# Altium PCB MainBoardPCB_4.PcbDoc (part 18 of 32)
Units mm, origin at the board's own origin, x right, y up, seen from the top; angles counter-clockwise.
Board outline 333.63 x 349.38 mm, 16 copper layers (L1, L2 (GND), L3 (Sign), L4 (GND), L5 (Sign), L6 (PWR/GND), L7(PWR/GND), L8 (Plane_GND), L9 (PWR/GND), L10 (PWR/GND), L11 (PWR/GND), L12 (Sign), L13 (GND), L14 (Sign), L15 (GND), L16), stack 2.502 mm thick; 2205 components, 1648 nets, 8314 pads, 3172 vias.
Unrouted connection lines stored in the file: 5141.
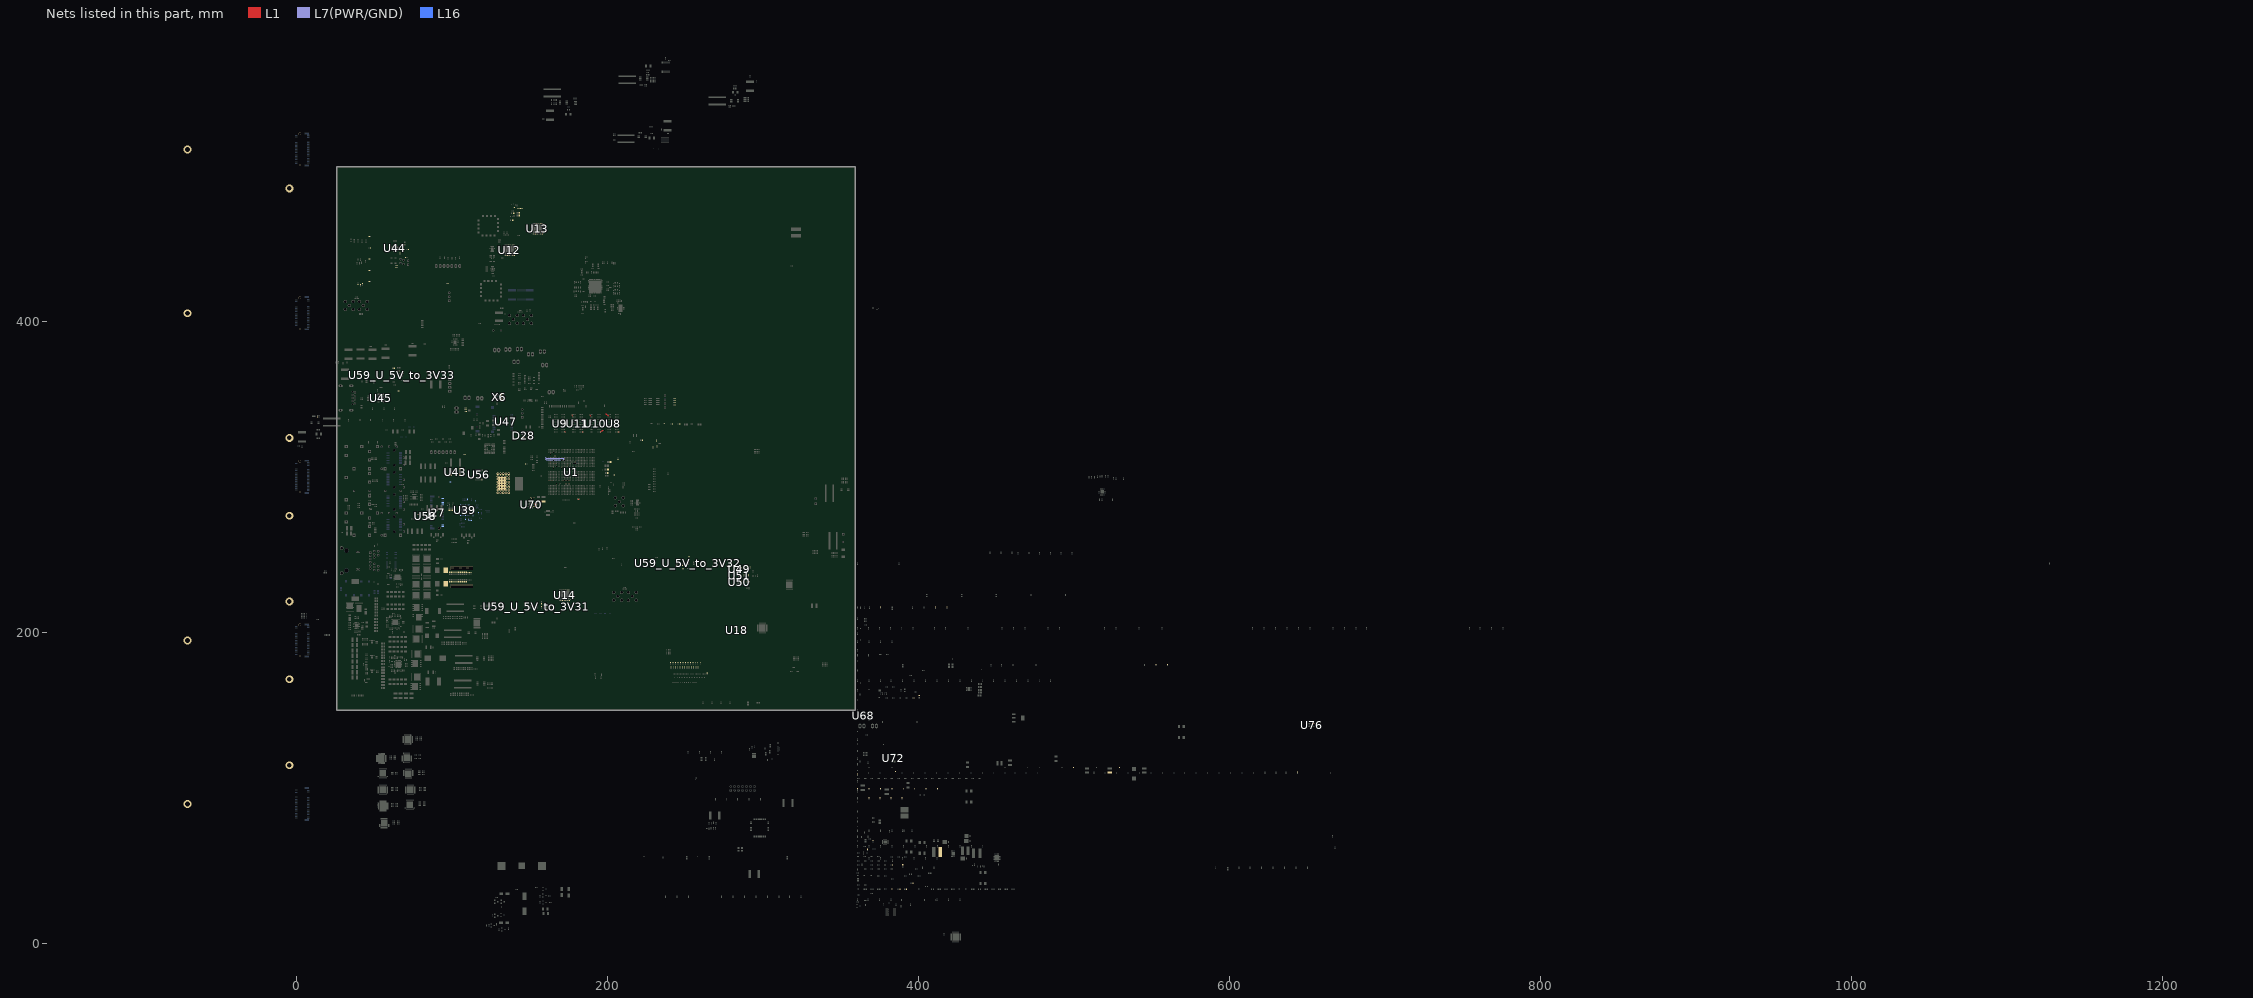
[diagram p21: the nets of this part, all layers, seen from the top]

## Part data (continued)
R532: library part Resistor, "Res Thick Film 0402 75 Ohm 1% 1/10W 100ppm/C Molded SMD SMD Punched Carrier T/R", Case Code (Imperial)=0402, Case Code (Metric)=1005, Manufacturer=Panasonic, Manufacturer Part Number=ERJ-2RKF75R0X, Max Operating Temperature=155°C, Max Power Dissipation=100mW, Min Operating Temperature=-55°C, Package Quantity=1, Supplier Part Number 1=P75.0LDKR-ND, Temperature Coefficient=100ppm/°C, Tolerance=1%, Voltage Rating=50V, Case/Package=0402, Category="Chip SMD Resistors", ComponentLink1Description=https://datasheet.ciiva.com/11821/0900766b80f80784-11821360.pdf?src-supplier=RSComponents, ComponentLink1URL=https://datasheet.ciiva.com/11821/0900766b80f80784-11821360.pdf?src-supplier=RSComponents, ComponentLink2Description=https://datasheet.ciiva.com/30254/aoa0000ce2-30254694.pdf?src-supplier=Onlinecomponents.com, ComponentLink2URL=https://datasheet.ciiva.com/30254/aoa0000ce2-30254694.pdf?src-supplier=Onlinecomponents.com, ComponentLink3Description=https://datasheet.ciiva.com/43460/426256-43460278.pdf?src-supplier=Farnell, ComponentLink3URL=https://datasheet.ciiva.com/43460/426256-43460278.pdf?src-supplier=Farnell, ComponentLink4Description=https://datasheet.ciiva.com/16777/70260748-16777802.pdf?src-supplier=Allied+Electronics, ComponentLink4URL=https://datasheet.ciiva.com/16777/70260748-16777802.pdf?src-supplier=Allied+Electronics, ComponentLink5Description=https://datasheet.ciiva.com/24071/aoa0000ce2-24071598.pdf?src-supplier=Mouser, ComponentLink5URL=https://datasheet.ciiva.com/24071/aoa0000ce2-24071598.pdf?src-supplier=Mouser, ComponentLink6Description=https://datasheet.ciiva.com/16772/70260748-16772175.pdf?src-supplier=Allied+Electronics, ComponentLink6URL=https://datasheet.ciiva.com/16772/70260748-16772175.pdf?src-supplier=Allied+Electronics, ComponentLink7Description=https://datasheet.ciiva.com/46377/426256-46377007.pdf?src-supplier=Element14, ComponentLink7URL=https://datasheet.ciiva.com/46377/426256-46377007.pdf?src-supplier=Element14, ComponentLink8Description=https://datasheet.ciiva.com/48531/aoa0000ce2-48531055.pdf?src-supplier=Avnet, ComponentLink8URL=https://datasheet.ciiva.com/48531/aoa0000ce2-48531055.pdf?src-supplier=Avnet, ComponentLink9Description=https://datasheet.ciiva.com/5917/426256-5917818.pdf?src-supplier=Farnell, ComponentLink9URL=https://datasheet.ciiva.com/5917/426256-5917818.pdf?src-supplier=Farnell, ComponentLink10Description=https://datasheet.ciiva.com/46388/426256-46388476.pdf?src-supplier=Element14, ComponentLink10URL=https://datasheet.ciiva.com/46388/426256-46388476.pdf?src-supplier=Element14, ComponentLink11Description=https://datasheet.ciiva.com/9187/aoa0000ce2-9187662.pdf?src-supplier=Avnet, ComponentLink11URL=https://datasheet.ciiva.com/9187/aoa0000ce2-9187662.pdf?src-supplier=Avnet, Composition="Thick Film", Contact Plating=Tin, Depth=0.5mm, Features="Automotive AEC-Q200", Height=0.35mm, Lead Free="Lead Free", Length=1mm, Military Standard=Not, Mount="Surface Mount", Number of Terminations=2, Packaging="Tape and Reel", Power Rating=100mW, Pricing 1="1=0,10000, 10=0,04000, 100=0,01620, 1000=0,00729, 2500=0,00632, 5000=0,00523 (USD)", Radiation Hardening=No, REACH SVHC="No SVHC", Resistance=75R, RoHS=Yes, Stock 1=1175660, Supplier 1=Digi-Key, Termination=SMD/SMT, Voltage Rating (DC)=50V, Width=0.02inch
R533: library part Resistor, "RES 30 OHM 1% 1/16W 0402", Case/Package=0402, Manufacturer="Stackpole Electronics", Manufacturer Part Number=RMCF0402FT30R0, Max Operating Temperature=155°C, Min Operating Temperature=-55°C, Supplier Part Number 1=RMCF0402FT30R0CT-ND, Temperature Coefficient=100ppm/°C, Tolerance=1%, Category="Chip SMD Resistors", ComponentLink1Description=https://www.seielect.com/catalog/SEI-Packaging.pdf?src-supplier=Digi-Key, ComponentLink1URL=https://www.seielect.com/catalog/SEI-Packaging.pdf?src-supplier=Digi-Key, ComponentLink2Description=https://www.seielect.com/catalog/SEI-RMCF_RMCP.pdf?src-supplier=Avnet, ComponentLink2URL=https://www.seielect.com/catalog/SEI-RMCF_RMCP.pdf?src-supplier=Avnet, Composition="Thick Film", Contact Plating=Tin,Matte, Mount="Surface Mount", Packaging="Tape and Reel", Pricing 1="1=0,10000, 10=0,01400, 100=0,00580, 1000=0,00262, 2500=0,00228, 5000=0,00188 (USD)", Radiation Hardening=No, Resistance=30R, RoHS=Yes, Stock 1=30664, Supplier 1=Digi-Key
R536 R537: library part Resistor, "RES SMD 150 OHM 1% 1/10W 0402", Case Code (Imperial)=0402, Case Code (Metric)=1005, Manufacturer=Panasonic, Manufacturer Part Number=ERJ-2RKF1500X, Max Operating Temperature=155°C, Max Power Dissipation=100mW, Min Operating Temperature=-55°C, Package Quantity=1, Supplier Part Number 1=P150LCT-ND, Temperature Coefficient=100ppm/°C, Tolerance=1%, Voltage Rating=50V, Case/Package=0402, Category="Chip SMD Resistors", ComponentLink1Description=https://datasheet.ciiva.com/34303/1987126-34303555.pdf?src-supplier=Jameco, ComponentLink1URL=https://datasheet.ciiva.com/34303/1987126-34303555.pdf?src-supplier=Jameco, ComponentLink2Description=https://datasheet.ciiva.com/11821/0900766b80f80784-11821183.pdf?src-supplier=RSComponents, ComponentLink2URL=https://datasheet.ciiva.com/11821/0900766b80f80784-11821183.pdf?src-supplier=RSComponents, ComponentLink3Description=https://datasheet.ciiva.com/16774/70260748-16774549.pdf?src-supplier=Allied+Electronics, ComponentLink3URL=https://datasheet.ciiva.com/16774/70260748-16774549.pdf?src-supplier=Allied+Electronics, ComponentLink4Description=https://datasheet.ciiva.com/43467/1678782-43467237.pdf?src-supplier=Farnell, ComponentLink4URL=https://datasheet.ciiva.com/43467/1678782-43467237.pdf?src-supplier=Farnell, ComponentLink5Description=https://datasheet.ciiva.com/7887/426256-7887016.pdf?src-supplier=Element14, ComponentLink5URL=https://datasheet.ciiva.com/7887/426256-7887016.pdf?src-supplier=Element14, ComponentLink6Description=https://datasheet.ciiva.com/16371/aoa0000ce2-16371497.pdf?src-supplier=Future+Electronics, ComponentLink6URL=https://datasheet.ciiva.com/16371/aoa0000ce2-16371497.pdf?src-supplier=Future+Electronics, ComponentLink7Description=https://datasheet.ciiva.com/7886/aoa0000ce2-7886714.pdf?src-supplier=Element14, ComponentLink7URL=https://datasheet.ciiva.com/7886/aoa0000ce2-7886714.pdf?src-supplier=Element14, ComponentLink8Description=https://datasheet.ciiva.com/46373/1678782-46373162.pdf?src-supplier=Element14, ComponentLink8URL=https://datasheet.ciiva.com/46373/1678782-46373162.pdf?src-supplier=Element14, ComponentLink9Description=https://datasheet.ciiva.com/46373/1678782-46373163.pdf?src-supplier=Element14, ComponentLink9URL=https://datasheet.ciiva.com/46373/1678782-46373163.pdf?src-supplier=Element14, ComponentLink10Description=https://datasheet.ciiva.com/16770/70260748-16770572.pdf?src-supplier=Allied+Electronics, ComponentLink10URL=https://datasheet.ciiva.com/16770/70260748-16770572.pdf?src-supplier=Allied+Electronics, ComponentLink11Description=https://datasheet.ciiva.com/17207/aoa0000ce2-17207389.pdf?src-supplier=Avnet+Europe, ComponentLink11URL=https://datasheet.ciiva.com/17207/aoa0000ce2-17207389.pdf?src-supplier=Avnet+Europe, ComponentLink12Description=https://datasheet.ciiva.com/28568/1678782-28568846.pdf?src-supplier=Element14, ComponentLink12URL=https://datasheet.ciiva.com/28568/1678782-28568846.pdf?src-supplier=Element14, ComponentLink13Description=https://datasheet.ciiva.com/30106/aoa0000ce2-30106926.pdf?src-supplier=Onlinecomponents.com, ComponentLink13URL=https://datasheet.ciiva.com/30106/aoa0000ce2-30106926.pdf?src-supplier=Onlinecomponents.com, ComponentLink14Description=https://datasheet.ciiva.com/22673/1678782-22673679.pdf?src-supplier=Element14, ComponentLink14URL=https://datasheet.ciiva.com/22673/1678782-22673679.pdf?src-supplier=Element14, Composition="Thick Film", Contact Plating=Tin, Depth=0.5mm, Features="Automotive AEC-Q200", Height=0.35mm, Lead Free="Lead Free", Length=1mm, Military Standard=Not, Mount="Surface Mount", Number of Pins=2, Number of Terminations=2, Packaging="Tape and Reel", Power Rating=100mW, Pricing 1="1=0,10000, 10=0,04100, 100=0,01670, 1000=0,00751, 2500=0,00652, 5000=0,00538 (USD)", Radiation Hardening=No, REACH SVHC="No SVHC", Resistance=150R, RoHS=Yes, Stock 1=1074892, Supplier 1=Digi-Key, Termination=SMD/SMT, Voltage Rating (DC)=50V, Width=0.02inch
R602 R603 R604 R605 R606 R608 R609: library part Resistor, "RES 10K OHM 0.1% 1/16W 0402", Case/Package=0402, Case Code (Metric)=1005, Manufacturer="Stackpole Electronics", Manufacturer Part Number=RNCF0402BTE10K0, Max Operating Temperature=155°C, Max Power Dissipation=63mW, Min Operating Temperature=-55°C, Package Quantity=10000, Supplier Part Number 1=RNCF0402BTE10K0CT-ND, Temperature Coefficient=25ppm/°C, Tolerance=0.1%, Case Code (Imperial)=0402, Category="Chip SMD Resistors", ComponentLink1Description=https://www.seielect.com/Catalog/SEI-rncf.pdf?src-supplier=Avnet, ComponentLink1URL=https://www.seielect.com/Catalog/SEI-rncf.pdf?src-supplier=Avnet, ComponentLink2Description=https://www.seielect.com/catalog/SEI-Packaging.pdf?src-supplier=Digi-Key, ComponentLink2URL=https://www.seielect.com/catalog/SEI-Packaging.pdf?src-supplier=Digi-Key, Composition="Thin Film", Contact Plating=Tin,Matte, Features="Moisture Resistant", Height=0.016inch, Length=0.039inch, Mount="Surface Mount", Number of Terminations=2, Packaging="Tape and Reel", Pricing 1="1=0,42000, 10=0,29900, 100=0,11950, 1000=0,05891, 2500=0,05457, 5000=0,04938 (USD)", Radiation Hardening=No, Resistance=10kR, RoHS=Yes, Stock 1=121200, Supplier 1=Digi-Key, Width=0.02inch
R610 R611: library part Resistor, Case/Package=0402, Case Code (Metric)=1005, Manufacturer=Yageo, Manufacturer Part Number=RC0402FR-071K33L, Max Operating Temperature=155°C, Max Power Dissipation=63mW, Min Operating Temperature=-55°C, Package Quantity=1, Power Rating=62.5mW, Supplier Part Number 1=311-1.33KLRCT-ND, Temperature Coefficient=100ppm/°C, Tolerance=1%, Voltage Rating=50V, Case Code (Imperial)=0402, ComponentLink1Description=https://datasheet.ciiva.com/2508/pyu-r-int-thick-7-2508289.pdf?src-supplier=Digi-Key, ComponentLink1URL=https://datasheet.ciiva.com/2508/pyu-r-int-thick-7-2508289.pdf?src-supplier=Digi-Key, ComponentLink2Description=https://datasheet.ciiva.com/2508/pyu-r-int-thick-7-2508290.pdf?src-supplier=Digi-Key, ComponentLink2URL=https://datasheet.ciiva.com/2508/pyu-r-int-thick-7-2508290.pdf?src-supplier=Digi-Key, ComponentLink3Description=https://datasheet.ciiva.com/2508/pyu-r-int-thick-7-2508291.pdf?src-supplier=Digi-Key, ComponentLink3URL=https://datasheet.ciiva.com/2508/pyu-r-int-thick-7-2508291.pdf?src-supplier=Digi-Key, ComponentLink4Description=https://datasheet.ciiva.com/16856/pyu-rc0402-51-rohs-l-6-16856582.pdf?src-supplier=Avnet+Europe, ComponentLink4URL=https://datasheet.ciiva.com/16856/pyu-rc0402-51-rohs-l-6-16856582.pdf?src-supplier=Avnet+Europe, ComponentLink5Description=https://datasheet.ciiva.com/8895/pyu-rc0402-51-rohs-l-6-8895561.pdf?src-supplier=Avnet, ComponentLink5URL=https://datasheet.ciiva.com/8895/pyu-rc0402-51-rohs-l-6-8895561.pdf?src-supplier=Avnet, ComponentLink6Description=https://datasheet.ciiva.com/17423/pyu-rc0402-51-rohs-l-6-r-17423946.pdf?src-supplier=Future+Electronics, ComponentLink6URL=https://datasheet.ciiva.com/17423/pyu-rc0402-51-rohs-l-6-r-17423946.pdf?src-supplier=Future+Electronics, ComponentLink7Description=https://datasheet.ciiva.com/28417/pyu-rc0402-51-rohs-l-6-28417821.pdf?src-supplier=Avnet+Europe, ComponentLink7URL=https://datasheet.ciiva.com/28417/pyu-rc0402-51-rohs-l-6-28417821.pdf?src-supplier=Avnet+Europe, Composition="Thick Film", Contact Plating=Tin,Matte,Lead, Depth=0.5mm, Features="Moisture Resistant", Height=0.016inch, Lead Free="Lead Free", Length=1mm, Military Standard=Not, Number of Terminations=2, Packaging="Tape and Reel", Pricing 1="1 = 0,10000, 10 = 0,01600, 100 = 0,00640, 1000 = 0,00289, 2500 = 0,00251, 5000 = 0,00207 (USD)", Radiation Hardening=No, Resistance=1.33kR, RoHS=Yes, Stock 1=189358, Supplier 1=Digi-Key, Termination=SMD/SMT, Width=0.02inch
R612 R614: library part Resistor, Case/Package=0402, Manufacturer="Vishay BCcomponents", Manufacturer Part Number=MCS04020C2203FE000, Max Operating Temperature=125°C, Min Operating Temperature=-55°C, Supplier Part Number 1=749-1566-1-ND, Temperature Coefficient=50ppm/°C, Tolerance=1%, ComponentLink1Description=https://datasheet.ciiva.com/16892/mc-pro-16892747.pdf?src-supplier=Avnet+Europe, ComponentLink1URL=https://datasheet.ciiva.com/16892/mc-pro-16892747.pdf?src-supplier=Avnet+Europe, Composition="Thin Film", Contact Plating=Tin, Depth=0.5mm, Lead Free="Lead Free", Length=1mm, Military Standard=Not, Packaging="Tape and Reel", Pricing 1="1 = 0,29000, 10 = 0,24200, 100 = 0,09460, 1000 = 0,03960, 2500 = 0,03630, 5000 = 0,03300 (USD)", Radiation Hardening=No, Resistance=270R, RoHS=Yes, Stock 1=29254, Supplier 1=Digi-Key, Width=500um
R613 R616: library part Resistor, Case/Package=1206, Case Code (Metric)=3216, Manufacturer="Vishay Dale", Manufacturer Part Number=CRCW12062R40FKEAHP, Max Operating Temperature=155°C, Max Power Dissipation=500mW, Min Operating Temperature=-55°C, Supplier Part Number 1=541-2.40UCT-ND, Temperature Coefficient=100ppm/°C, Tolerance=1%, Case Code (Imperial)=1206, ComponentLink1Description=http://www.vishay.com/docs/20043/crcwhpe3.pdf?src-supplier=Digi-Key, ComponentLink1URL=http://www.vishay.com/docs/20043/crcwhpe3.pdf?src-supplier=Digi-Key, Composition="Thick Film", Features="Automotive AEC-Q200", Height=0.026inch, Lead Free="Lead Free", Length=0.122inch, Number of Terminations=2, Packaging="Cut Tape", Pricing 1="1 = 0,43000, 10 = 0,32600, 100 = 0,13720, 1000 = 0,07568, 2500 = 0,07095 (USD)", Resistance=2.4R, RoHS=Yes, Stock 1=24526, Supplier 1=Digi-Key, Width=0.063inch
R617: "RES 0.004 OHM 1% 7W 5931", Case/Package=5931, Manufacturer=Yageo, Max Operating Temperature=170°C, Max Power Dissipation=7W, Min Operating Temperature=-65°C, Resistance=4mR, Supplier Part Number 1=YAG4096CT-ND, Temperature Coefficient=75ppm/°C, Tolerance=1%, Category="Chip SMD Resistors", ComponentLink1Description=http://www.yageo.com/documents/recent/PYu-PU_51_RoHS_L_6.pdf?src-supplier=Digi-Key, ComponentLink1URL=http://www.yageo.com/documents/recent/PYu-PU_51_RoHS_L_6.pdf?src-supplier=Digi-Key, ComponentLink2Description=http://www.yageo.com/documents/recent/PYu-PU_51_RoHS_L_3.pdf?src-supplier=Digi-Key, ComponentLink2URL=http://www.yageo.com/documents/recent/PYu-PU_51_RoHS_L_3.pdf?src-supplier=Digi-Key, Composition="Metal Element", Features="Moisture Resistant,Automotive AEC-Q200", Height=0.015inch, Length=0.591inch, Manufacturer Part Number=PU5931FKMP70R004L, Number of Terminations=2, Packaging="Cut Tape", Pricing 1="1=2,01000, 10=1,78200, 25=1,65280, 50=1,55540, 100=1,36110, 250=1,16660, 500=0,97218 (USD)", RoHS=Yes, Stock 1=1315, Supplier 1=Digi-Key, Width=0.305inch
R619: library part Resistor, Case/Package=0402, Case Code (Metric)=1005, Manufacturer="Stackpole Electronics", Manufacturer Part Number=RMCF0402FT1K91, Max Operating Temperature=155°C, Max Power Dissipation=63mW, Min Operating Temperature=-55°C, Supplier Part Number 1=RMCF0402FT1K91CT-ND, Temperature Coefficient=100ppm/°C, Tolerance=1%, Case Code (Imperial)=0402, ComponentLink1Description=http://components.arrow.com/part/dataview/51399400S357618N1174?src-supplier=Arrow, ComponentLink1URL=http://components.arrow.com/part/dataview/51399400S357618N1174?src-supplier=Arrow, ComponentLink2Description=https://www.seielect.com/Catalog/SEI-RMCF_RMCP.pdf?src-supplier=Digi-Key, ComponentLink2URL=https://www.seielect.com/Catalog/SEI-RMCF_RMCP.pdf?src-supplier=Digi-Key, ComponentLink3Description=https://www.seielect.com/catalog/SEI-RMCF_RMCP.pdf?src-supplier=Avnet, ComponentLink3URL=https://www.seielect.com/catalog/SEI-RMCF_RMCP.pdf?src-supplier=Avnet, ComponentLink4Description=https://www.seielect.com/catalog/SEI-Packaging.pdf?src-supplier=Digi-Key, ComponentLink4URL=https://www.seielect.com/catalog/SEI-Packaging.pdf?src-supplier=Digi-Key, Composition="Thick Film", Contact Plating=Tin,Matte, Features="Automotive AEC-Q200", Height=0.016inch, Lead Free="Lead Free", Length=0.039inch, Mount="Surface Mount", Number of Terminations=2, Packaging="Tape and Reel", Pricing 1="1 = 0,10000, 10 = 0,01400, 100 = 0,00580, 1000 = 0,00262, 2500 = 0,00228, 5000 = 0,00188 (USD)", Radiation Hardening=No, Resistance=1.91kR, RoHS=Yes, Stock 1=24353, Supplier 1=Digi-Key, Width=0.02inch
R620: library part Resistor, Case/Package=0402, Case Code (Metric)=1005, Manufacturer=Yageo, Manufacturer Part Number=RC0402FR-072KL, Max Operating Temperature=155°C, Max Power Dissipation=63mW, Min Operating Temperature=-55°C, Package Quantity=1, Supplier Part Number 1=311-2KLRCT-ND, Temperature Coefficient=100ppm/°C, Tolerance=1%, Voltage Rating=50V, Case Code (Imperial)=0402, ComponentLink1Description=https://datasheet.ciiva.com/11808/0900766b80c66297-11808787.pdf?src-supplier=RSComponents, ComponentLink1URL=https://datasheet.ciiva.com/11808/0900766b80c66297-11808787.pdf?src-supplier=RSComponents, ComponentLink2Description=https://datasheet.ciiva.com/2453/pyu-r-int-thick-7-2453634.pdf?src-supplier=Digi-Key, ComponentLink2URL=https://datasheet.ciiva.com/2453/pyu-r-int-thick-7-2453634.pdf?src-supplier=Digi-Key, ComponentLink3Description=https://datasheet.ciiva.com/2453/pyu-r-int-thick-7-2453635.pdf?src-supplier=Digi-Key, ComponentLink3URL=https://datasheet.ciiva.com/2453/pyu-r-int-thick-7-2453635.pdf?src-supplier=Digi-Key, ComponentLink4Description=https://datasheet.ciiva.com/2453/pyu-r-int-thick-7-2453636.pdf?src-supplier=Digi-Key, ComponentLink4URL=https://datasheet.ciiva.com/2453/pyu-r-int-thick-7-2453636.pdf?src-supplier=Digi-Key, ComponentLink5Description=https://datasheet.ciiva.com/15189/getdatasheetpartid-358921-15189414.pdf?src-supplier=Verical, ComponentLink5URL=https://datasheet.ciiva.com/15189/getdatasheetpartid-358921-15189414.pdf?src-supplier=Verical, ComponentLink6Description=https://datasheet.ciiva.com/12667/pyu-rc0402-51-rohs-l-6-r-12667451.pdf?src-supplier=Mouser, ComponentLink6URL=https://datasheet.ciiva.com/12667/pyu-rc0402-51-rohs-l-6-r-12667451.pdf?src-supplier=Mouser, ComponentLink7Description=https://datasheet.ciiva.com/7983/1018594-7983517.pdf?src-supplier=Element14, ComponentLink7URL=https://datasheet.ciiva.com/7983/1018594-7983517.pdf?src-supplier=Element14, ComponentLink8Description=https://datasheet.ciiva.com/7849/1018594-7849934.pdf?src-supplier=Element14, ComponentLink8URL=https://datasheet.ciiva.com/7849/1018594-7849934.pdf?src-supplier=Element14, ComponentLink9Description=https://datasheet.ciiva.com/7849/1018594-7849935.pdf?src-supplier=Element14, ComponentLink9URL=https://datasheet.ciiva.com/7849/1018594-7849935.pdf?src-supplier=Element14, Composition="Thick Film", Depth=0.5mm, Features="Moisture Resistant", Height=0.016inch, Lead Free="Lead Free", Length=1mm, Military Standard=Not, Number of Terminations=2, Packaging="Tape and Reel", Power Rating=63mW, Pricing 1="1 = 0,10000, 10 = 0,01600, 100 = 0,00640, 1000 = 0,00289, 2500 = 0,00251, 5000 = 0,00207 (USD)", REACH SVHC=Unknown, Resistance=2kR, RoHS=Yes, Stock 1=9276818, Supplier 1=Digi-Key, Termination=SMD/SMT, Voltage Rating (DC)=50V, Width=0.02inch, Working Voltage=50V
R621: library part Resistor, Case/Package=0402, Case Code (Metric)=1005, Manufacturer="Stackpole Electronics", Manufacturer Part Number=RMCF0402FT147K, Max Operating Temperature=155°C, Max Power Dissipation=63mW, Min Operating Temperature=-55°C, Temperature Coefficient=100ppm/°C, Tolerance=1%, Case Code (Imperial)=0402, ComponentLink1Description=https://www.seielect.com/Catalog/SEI-RMCF_RMCP.pdf?src-supplier=Digi-Key, ComponentLink1URL=https://www.seielect.com/Catalog/SEI-RMCF_RMCP.pdf?src-supplier=Digi-Key, ComponentLink2Description=https://www.seielect.com/catalog/SEI-Packaging.pdf?src-supplier=Digi-Key, ComponentLink2URL=https://www.seielect.com/catalog/SEI-Packaging.pdf?src-supplier=Digi-Key, ComponentLink3Description=https://www.seielect.com/catalog/SEI-RMCF_RMCP.pdf?src-supplier=Avnet, ComponentLink3URL=https://www.seielect.com/catalog/SEI-RMCF_RMCP.pdf?src-supplier=Avnet, Composition="Thick Film", Contact Plating=Tin,Matte, Depth=0.5mm, Features="Automotive AEC-Q200", Height=0.016inch, Lead Free="Lead Free", Length=0.039inch, Military Standard=Not, Mount="Surface Mount", Number of Terminations=2, Packaging="Tape and Reel", Pricing 1="1 = 0,10000, 10 = 0,01400, 100 = 0,00580, 1000 = 0,00262, 2500 = 0,00228, 5000 = 0,00188 (USD)", Radiation Hardening=No, Resistance=147kR, RoHS=Yes, Stock 1=24917, Supplier 1=Digi-Key, Width=0.02inch
R622: library part Resistor, Case/Package=0402, Case Code (Metric)=1005, Manufacturer="Stackpole Electronics", Manufacturer Part Number=RMCF0402FT340K, Max Operating Temperature=155°C, Max Power Dissipation=63mW, Min Operating Temperature=-55°C, Supplier Part Number 1=RMCF0402FT340KCT-ND, Temperature Coefficient=100ppm/°C, Tolerance=1%, Case Code (Imperial)=0402, ComponentLink1Description=https://www.verical.com/server-webapp/html/getDatasheet?partID=689254&src-supplier=Verical, ComponentLink1URL=https://www.verical.com/server-webapp/html/getDatasheet?partID=689254&src-supplier=Verical, ComponentLink2Description=http://components.arrow.com/part/dataview/47811509S8404077N1174?src-supplier=Arrow, ComponentLink2URL=http://components.arrow.com/part/dataview/47811509S8404077N1174?src-supplier=Arrow, ComponentLink3Description=https://www.seielect.com/catalog/SEI-RMCF_RMCP.pdf?src-supplier=Avnet, ComponentLink3URL=https://www.seielect.com/catalog/SEI-RMCF_RMCP.pdf?src-supplier=Avnet, ComponentLink4Description=https://www.seielect.com/Catalog/SEI-RMCF_RMCP.pdf?src-supplier=Digi-Key, ComponentLink4URL=https://www.seielect.com/Catalog/SEI-RMCF_RMCP.pdf?src-supplier=Digi-Key, ComponentLink5Description=https://www.seielect.com/catalog/SEI-Packaging.pdf?src-supplier=Digi-Key, ComponentLink5URL=https://www.seielect.com/catalog/SEI-Packaging.pdf?src-supplier=Digi-Key, Composition="Thick Film", Contact Plating=Tin,Matte, Depth=0.5mm, Features="Automotive AEC-Q200", Height=0.016inch, Length=0.039inch, Military Standard=Not, Mount="Surface Mount", Number of Terminations=2, Packaging="Tape and Reel", Pricing 1="1 = 0,10000, 10 = 0,01400, 100 = 0,00580, 1000 = 0,00262, 2500 = 0,00228, 5000 = 0,00188 (USD)", Radiation Hardening=No, Resistance=340kR, RoHS=Yes, Stock 1=52105, Supplier 1=Digi-Key, Width=0.02inch
R623: library part Resistor, Case/Package=0402, Case Code (Metric)=1005, Manufacturer=Panasonic, Manufacturer Part Number=ERA-2AEB1431X, Max Operating Temperature=155°C, Max Power Dissipation=63mW, Min Operating Temperature=-55°C, Package Quantity=1, Power Rating=62.5mW, Supplier Part Number 1=P1.43KDCCT-ND, Temperature Coefficient=25ppm/°C, Tolerance=0.1%, Voltage Rating=50V, Case Code (Imperial)=0402, ComponentLink1Description=http://www.mouser.com/ds/2/315/AOA0000C237-1100991.pdf?src-supplier=Mouser, ComponentLink1URL=http://www.mouser.com/ds/2/315/AOA0000C237-1100991.pdf?src-supplier=Mouser, ComponentLink2Description=https://industrial.panasonic.com/cdbs/www-data/pdf/RDM0000/AOA0000C307.pdf?src-supplier=Digi-Key, ComponentLink2URL=https://industrial.panasonic.com/cdbs/www-data/pdf/RDM0000/AOA0000C307.pdf?src-supplier=Digi-Key, ComponentLink3Description=http://www.farnell.com/datasheets/2052875.pdf?src-supplier=Newark, ComponentLink3URL=http://www.farnell.com/datasheets/2052875.pdf?src-supplier=Newark, ComponentLink4Description=http://industrial.panasonic.com/www-data/pdf/AOA0000/AOA0000CE26.pdf?src-supplier=Avnet, ComponentLink4URL=http://industrial.panasonic.com/www-data/pdf/AOA0000/AOA0000CE26.pdf?src-supplier=Avnet, ComponentLink5Description=http://www.onlinecomponents.com/datasheet/era-2aeb1431x.aspx?p=44473575&src-supplier=Onlinecomponents.com, ComponentLink5URL=http://www.onlinecomponents.com/datasheet/era-2aeb1431x.aspx?p=44473575&src-supplier=Onlinecomponents.com, ComponentLink6Description=http://www.farnell.com/datasheets/1818319.pdf?src-supplier=Element14, ComponentLink6URL=http://www.farnell.com/datasheets/1818319.pdf?src-supplier=Element14, Composition="Thin Film", Features="Automotive AEC-Q200", Height=0.016inch, Lead Free="Lead Free", Length=0.039inch, Mount="Surface Mount", Number of Terminations=2, Packaging="Tape and Reel", Pricing 1="1 = 0,45000, 10 = 0,32100, 100 = 0,12830, 1000 = 0,06322, 2500 = 0,05858, 5000 = 0,05300 (USD)", REACH SVHC=Unknown, Resistance=1.43kR, RoHS=Yes, Stock 1=20142, Supplier 1=Digi-Key, Termination=SMD/SMT, Voltage Rating (DC)=50V, Weight=2.8E-05oz, Width=0.02inch
R624: library part Resistor, Case/Package=0402, Case Code (Metric)=1005, Manufacturer=Panasonic, Manufacturer Part Number=ERJ-2RKF1502X, Max Operating Temperature=155°C, Max Power Dissipation=100mW, Min Operating Temperature=-55°C, Package Quantity=1, Supplier Part Number 1=P15.0KLDKR-ND, Temperature Coefficient=100ppm/°C, Tolerance=1%, Voltage Rating=50V, Case Code (Imperial)=0402, ComponentLink1Description=https://datasheet.ciiva.com/11821/0900766b80f80784-11821181.pdf?src-supplier=RSComponents, ComponentLink1URL=https://datasheet.ciiva.com/11821/0900766b80f80784-11821181.pdf?src-supplier=RSComponents, ComponentLink2Description=https://datasheet.ciiva.com/16778/70260748-16778682.pdf?src-supplier=Allied+Electronics, ComponentLink2URL=https://datasheet.ciiva.com/16778/70260748-16778682.pdf?src-supplier=Allied+Electronics, ComponentLink3Description=https://datasheet.ciiva.com/46372/1678782-46372862.pdf?src-supplier=Element14, ComponentLink3URL=https://datasheet.ciiva.com/46372/1678782-46372862.pdf?src-supplier=Element14, ComponentLink4Description=https://datasheet.ciiva.com/17211/aoa0000ce2-17211535.pdf?src-supplier=Avnet+Europe, ComponentLink4URL=https://datasheet.ciiva.com/17211/aoa0000ce2-17211535.pdf?src-supplier=Avnet+Europe, ComponentLink5Description=https://datasheet.ciiva.com/46372/1678782-46372863.pdf?src-supplier=Element14, ComponentLink5URL=https://datasheet.ciiva.com/46372/1678782-46372863.pdf?src-supplier=Element14, ComponentLink6Description=https://datasheet.ciiva.com/6138/aoa0000ce2-6138166.pdf?src-supplier=Farnell, ComponentLink6URL=https://datasheet.ciiva.com/6138/aoa0000ce2-6138166.pdf?src-supplier=Farnell, ComponentLink7Description=https://datasheet.ciiva.com/16765/70260748-16765542.pdf?src-supplier=Allied+Electronics, ComponentLink7URL=https://datasheet.ciiva.com/16765/70260748-16765542.pdf?src-supplier=Allied+Electronics, ComponentLink8Description=https://datasheet.ciiva.com/43467/1678782-43467414.pdf?src-supplier=Farnell, ComponentLink8URL=https://datasheet.ciiva.com/43467/1678782-43467414.pdf?src-supplier=Farnell, ComponentLink9Description=https://datasheet.ciiva.com/9193/aoa0000ce2-9193047.pdf?src-supplier=Avnet, ComponentLink9URL=https://datasheet.ciiva.com/9193/aoa0000ce2-9193047.pdf?src-supplier=Avnet, ComponentLink10Description=https://datasheet.ciiva.com/8079/426256-8079609.pdf?src-supplier=Element14, ComponentLink10URL=https://datasheet.ciiva.com/8079/426256-8079609.pdf?src-supplier=Element14, ComponentLink11Description=https://datasheet.ciiva.com/16371/aoa0000ce2-16371499.pdf?src-supplier=Future+Electronics, ComponentLink11URL=https://datasheet.ciiva.com/16371/aoa0000ce2-16371499.pdf?src-supplier=Future+Electronics, ComponentLink12Description=https://datasheet.ciiva.com/22687/1678782-22687068.pdf?src-supplier=Element14, ComponentLink12URL=https://datasheet.ciiva.com/22687/1678782-22687068.pdf?src-supplier=Element14, Composition="Thick Film", Contact Plating=Tin, Depth=0.5mm, Features="Automotive AEC-Q200", Height=0.35mm, Lead Free="Lead Free", Length=1mm, Military Standard=Not, Mount="Surface Mount", Number of Pins=2, Number of Terminations=2, Packaging="Tape and Reel", Power Rating=100mW, Pricing 1="1 = 0,10000, 10 = 0,04100, 100 = 0,01670, 1000 = 0,00751, 2500 = 0,00652, 5000 = 0,00538 (USD)", Radiation Hardening=No, REACH SVHC="No SVHC", Resistance=15kR, RoHS=Yes, Stock 1=3339464, Supplier 1=Digi-Key, Termination=SMD/SMT, Voltage Rating (DC)=50V, Weight=2.8E-05oz, Width=0.5mm
R625: library part Resistor, "Thick Film Resistors - SMD 1.4K OHM 1%", Case/Package=0402, Case Code (Metric)=1005, Manufacturer=Yageo, Manufacturer Part Number=RC0402FR-071K4L, Max Operating Temperature=155°C, Max Power Dissipation=63mW, Min Operating Temperature=-55°C, Power Rating=62.5mW, Supplier Part Number 1=YAG3039CT-ND, Temperature Coefficient=100ppm/°C, Tolerance=1%, Voltage Rating=50V, Case Code (Imperial)=0402, Category="Chip SMD Resistors", ComponentLink1Description=https://datasheet.ciiva.com/8895/pyu-rc0402-51-rohs-l-6-8895498.pdf?src-supplier=Avnet, ComponentLink1URL=https://datasheet.ciiva.com/8895/pyu-rc0402-51-rohs-l-6-8895498.pdf?src-supplier=Avnet, Composition="Thick Film", Contact Plating=Tin,Matte, Depth=0.5mm, Features="Moisture Resistant", Height=0.016inch, Lead Free="Lead Free", Length=1mm, Military Standard=Not, Number of Terminations=2, Packaging="Tape and Reel", Pricing 1="1=0,10000, 10=0,01600, 100=0,00640, 1000=0,00289, 2500=0,00251, 5000=0,00207 (USD)", Radiation Hardening=No, Resistance=1.4kR, RoHS=Yes, Stock 1=496856, Supplier 1=Digi-Key, Termination=SMD/SMT, Voltage Rating (DC)=50V, Width=0.5mm
R626: library part Resistor, Case/Package=0402, Manufacturer="Vishay BCcomponents", Manufacturer Part Number=MCS04020C2003FE000, Max Operating Temperature=125°C, Min Operating Temperature=-55°C, Supplier Part Number 1=749-1562-1-ND, Temperature Coefficient=50ppm/°C, Tolerance=1%, ComponentLink1Description=https://datasheet.ciiva.com/8899/mc-pro-8899257.pdf?src-supplier=Avnet, ComponentLink1URL=https://datasheet.ciiva.com/8899/mc-pro-8899257.pdf?src-supplier=Avnet, ComponentLink2Description=https://datasheet.ciiva.com/17167/mc-pro-17167599.pdf?src-supplier=Avnet+Europe, ComponentLink2URL=https://datasheet.ciiva.com/17167/mc-pro-17167599.pdf?src-supplier=Avnet+Europe, Composition="Thin Film", Contact Plating=Tin, Depth=0.5mm, Lead Free="Lead Free", Length=1mm, Military Standard=Not, Packaging="Tape and Reel", Pricing 1="1 = 0,29000, 10 = 0,24200, 100 = 0,09460, 1000 = 0,03960, 2500 = 0,03630, 5000 = 0,03300 (USD)", Radiation Hardening=No, Resistance=200kR, RoHS=Yes, Stock 1=19500, Supplier 1=Digi-Key, Width=500um
R627: library part Resistor, Case/Package=0402, Case Code (Metric)=1005, Manufacturer=Yageo, Manufacturer Part Number=RC0402FR-0710K5L, Max Operating Temperature=155°C, Max Power Dissipation=63mW, Min Operating Temperature=-55°C, Power Rating=62.5mW, Supplier Part Number 1=YAG2951CT-ND, Temperature Coefficient=100ppm/°C, Tolerance=1%, Voltage Rating=50V, Case Code (Imperial)=0402, ComponentLink1Description=https://datasheet.ciiva.com/16869/pyu-rc0402-51-rohs-l-6-16869593.pdf?src-supplier=Avnet+Europe, ComponentLink1URL=https://datasheet.ciiva.com/16869/pyu-rc0402-51-rohs-l-6-16869593.pdf?src-supplier=Avnet+Europe, ComponentLink2Description=https://datasheet.ciiva.com/28405/pyu-rc0402-51-rohs-l-6-28405371.pdf?src-supplier=Avnet+Europe, ComponentLink2URL=https://datasheet.ciiva.com/28405/pyu-rc0402-51-rohs-l-6-28405371.pdf?src-supplier=Avnet+Europe, Composition="Thick Film", Contact Plating=Tin,Matte, Depth=0.5mm, Features="Moisture Resistant", Height=0.016inch, Lead Free="Lead Free", Length=1mm, Military Standard=Not, Number of Terminations=2, Packaging="Tape and Reel", Pricing 1="1 = 0,10000, 10 = 0,01600, 100 = 0,00640, 1000 = 0,00289, 2500 = 0,00251, 5000 = 0,00207 (USD)", Resistance=10.5kR, RoHS=Yes, Stock 1=553303, Supplier 1=Digi-Key, Termination=SMD/SMT, Voltage Rating (DC)=50V, Width=0.02inch
R628: library part Resistor, Case/Package=0402, Case Code (Metric)=1005, Manufacturer="Stackpole Electronics", Manufacturer Part Number=RMCF0402FT750K, Max Operating Temperature=155°C, Max Power Dissipation=63mW, Min Operating Temperature=-55°C, Supplier Part Number 1=RMCF0402FT750KCT-ND, Temperature Coefficient=100ppm/°C, Tolerance=1%, Case Code (Imperial)=0402, ComponentLink1Description=http://components.arrow.com/part/dataview/50604042S6212064N1174?src-supplier=Arrow, ComponentLink1URL=http://components.arrow.com/part/dataview/50604042S6212064N1174?src-supplier=Arrow, ComponentLink2Description=https://www.seielect.com/catalog/SEI-RMCF_RMCP.pdf?src-supplier=Avnet, ComponentLink2URL=https://www.seielect.com/catalog/SEI-RMCF_RMCP.pdf?src-supplier=Avnet, ComponentLink3Description=https://www.seielect.com/catalog/SEI-Packaging.pdf?src-supplier=Digi-Key, ComponentLink3URL=https://www.seielect.com/catalog/SEI-Packaging.pdf?src-supplier=Digi-Key, ComponentLink4Description=https://www.seielect.com/Catalog/SEI-RMCF_RMCP.pdf?src-supplier=Digi-Key, ComponentLink4URL=https://www.seielect.com/Catalog/SEI-RMCF_RMCP.pdf?src-supplier=Digi-Key, Composition="Thick Film", Contact Plating=Tin,Matte, Features="Automotive AEC-Q200", Height=0.016inch, Lead Free="Lead Free", Length=0.039inch, Mount="Surface Mount", Number of Terminations=2, Packaging="Tape and Reel", Pricing 1="1 = 0,10000, 10 = 0,01400, 100 = 0,00580, 1000 = 0,00262, 2500 = 0,00228, 5000 = 0,00188 (USD)", Radiation Hardening=No, Resistance=750kR, RoHS=Yes, Stock 1=45545, Supplier 1=Digi-Key, Width=0.02inch
R631: library part Resistor, Case/Package=0402, Case Code (Metric)=1005, Manufacturer="Stackpole Electronics", Manufacturer Part Number=RMCF0402FT5K90, Max Operating Temperature=155°C, Max Power Dissipation=63mW, Min Operating Temperature=-55°C, Supplier Part Number 1=RMCF0402FT5K90CT-ND, Temperature Coefficient=100ppm/°C, Tolerance=1%, Case Code (Imperial)=0402, ComponentLink1Description=https://www.seielect.com/Catalog/SEI-RMCF_RMCP.pdf?src-supplier=Digi-Key, ComponentLink1URL=https://www.seielect.com/Catalog/SEI-RMCF_RMCP.pdf?src-supplier=Digi-Key, ComponentLink2Description=https://www.seielect.com/catalog/SEI-Packaging.pdf?src-supplier=Digi-Key, ComponentLink2URL=https://www.seielect.com/catalog/SEI-Packaging.pdf?src-supplier=Digi-Key, ComponentLink3Description=https://www.seielect.com/catalog/SEI-RMCF_RMCP.pdf?src-supplier=Avnet, ComponentLink3URL=https://www.seielect.com/catalog/SEI-RMCF_RMCP.pdf?src-supplier=Avnet, Composition="Thick Film", Contact Plating=Tin,Matte, Features="Automotive AEC-Q200", Height=0.016inch, Lead Free="Lead Free", Length=0.039inch, Mount="Surface Mount", Number of Terminations=2, Packaging="Tape and Reel", Pricing 1="1 = 0,10000, 10 = 0,01400, 100 = 0,00580, 1000 = 0,00262, 2500 = 0,00228, 5000 = 0,00188 (USD)", Radiation Hardening=No, Resistance=5.9kR, RoHS=Yes, Stock 1=22990, Supplier 1=Digi-Key, Width=0.02inch
R644: library part Resistor, Case/Package=0402, Case Code (Metric)=1005, Manufacturer=Vishay, Manufacturer Part Number=CRCW04029K10FKED, Max Operating Temperature=155°C, Max Power Dissipation=63mW, Min Operating Temperature=-55°C, Package Quantity=10, Supplier Part Number 1=541-9.10KLCT-ND, Temperature Coefficient=100ppm/°C, Tolerance=1%, Voltage Rating=50V, Case Code (Imperial)=0402, ComponentLink1Description=https://datasheet.ciiva.com/11818/0900766b80d98824-11818153.pdf?src-supplier=RSComponents, ComponentLink1URL=https://datasheet.ciiva.com/11818/0900766b80d98824-11818153.pdf?src-supplier=RSComponents, ComponentLink2Description=https://datasheet.ciiva.com/7663/1697337-7663862.pdf?src-supplier=Element14, ComponentLink2URL=https://datasheet.ciiva.com/7663/1697337-7663862.pdf?src-supplier=Element14, ComponentLink3Description=https://datasheet.ciiva.com/7743/dcrcwe3-7743783.pdf?src-supplier=Element14, ComponentLink3URL=https://datasheet.ciiva.com/7743/dcrcwe3-7743783.pdf?src-supplier=Element14, ComponentLink4Description=https://datasheet.ciiva.com/22676/1912744-22676327.pdf?src-supplier=Element14, ComponentLink4URL=https://datasheet.ciiva.com/22676/1912744-22676327.pdf?src-supplier=Element14, ComponentLink5Description=https://datasheet.ciiva.com/5552/dcrcwe3-109170-5552459.pdf?src-supplier=Mouser, ComponentLink5URL=https://datasheet.ciiva.com/5552/dcrcwe3-109170-5552459.pdf?src-supplier=Mouser, ComponentLink6Description=https://datasheet.ciiva.com/2464/dcrcwe3-2464516.pdf?src-supplier=Digi-Key, ComponentLink6URL=https://datasheet.ciiva.com/2464/dcrcwe3-2464516.pdf?src-supplier=Digi-Key, ComponentLink7Description=https://datasheet.ciiva.com/2464/dcrcwe3-2464517.pdf?src-supplier=Digi-Key, ComponentLink7URL=https://datasheet.ciiva.com/2464/dcrcwe3-2464517.pdf?src-supplier=Digi-Key, ComponentLink8Description=https://datasheet.ciiva.com/7663/1697337-7663861.pdf?src-supplier=Element14, ComponentLink8URL=https://datasheet.ciiva.com/7663/1697337-7663861.pdf?src-supplier=Element14, ComponentLink9Description=https://datasheet.ciiva.com/2464/dcrcwe3-2464518.pdf?src-supplier=Digi-Key, ComponentLink9URL=https://datasheet.ciiva.com/2464/dcrcwe3-2464518.pdf?src-supplier=Digi-Key, ComponentLink10Description=https://datasheet.ciiva.com/16507/dcrcwe3-16507145.pdf?src-supplier=Future+Electronics, ComponentLink10URL=https://datasheet.ciiva.com/16507/dcrcwe3-16507145.pdf?src-supplier=Future+Electronics, Composition="Thick Film", Contact Plating=Tin, Depth=0.5mm, Features="Automotive AEC-Q200", Height=0.35mm, Lead Free="Lead Free", Length=1mm, Military Standard=Not, Number of Terminations=2, Packaging="Tape and Reel", Power Rating=63mW, Pricing 1="1 = 0,10000, 10 = 0,03600, 100 = 0,01460, 1000 = 0,00657, 2500 = 0,00570, 5000 = 0,00471 (USD)", Radiation Hardening=No, REACH SVHC=Unknown, Resistance=9.1kR, RoHS=Yes, Stock 1=23693, Supplier 1=Digi-Key, Termination=SMD/SMT, Voltage Rating (DC)=50V, Weight=2.3E-05oz, Width=0.02inch
R645: library part Resistor, Case/Package=0402, Case Code (Metric)=1005, Manufacturer=Panasonic, Manufacturer Part Number=ERA-2AED133X, Max Operating Temperature=155°C, Max Power Dissipation=63mW, Min Operating Temperature=-55°C, Package Quantity=1, Power Rating=62.5mW, Supplier Part Number 1=P13KDECT-ND, Temperature Coefficient=25ppm/°C, Tolerance=0.5%, Case Code (Imperial)=0402, ComponentLink1Description=https://datasheet.ciiva.com/9193/aoa0000ce26-9193390.pdf?src-supplier=Avnet, ComponentLink1URL=https://datasheet.ciiva.com/9193/aoa0000ce26-9193390.pdf?src-supplier=Avnet, Composition="Thin Film", Contact Plating=Tin, Features="Automotive AEC-Q200", Height=0.016inch, Lead Free="Lead Free", Length=0.039inch, Mount="Surface Mount", Number of Terminations=2, Packaging="Tape and Reel", Pricing 1="1 = 0,22000, 10 = 0,18800, 100 = 0,07350, 1000 = 0,03077, 2500 = 0,02820, 5000 = 0,02564 (USD)", Resistance=13kR, RoHS=Yes, Stock 1=10324, Supplier 1=Digi-Key, Width=0.02inch
R647: library part Resistor, "RES SMD 100K OHM 1% 1/16W 0402", Case Code (Imperial)=0402, Case Code (Metric)=1005, Manufacturer=Yageo, Manufacturer Part Number=RC0402FR-07100KL, Max Operating Temperature=155°C, Max Power Dissipation=63mW, Min Operating Temperature=-55°C, Package Quantity=1, Supplier Part Number 1=311-100KLRDKR-ND, Temperature Coefficient=100ppm/°C, Tolerance=1%, Voltage Rating=50V, Case/Package=0402, Category="Chip SMD Resistors", ComponentLink1Description=https://datasheet.ciiva.com/11819/0900766b80c66297-11819452.pdf?src-supplier=RSComponents, ComponentLink1URL=https://datasheet.ciiva.com/11819/0900766b80c66297-11819452.pdf?src-supplier=RSComponents, ComponentLink2Description=https://datasheet.ciiva.com/2453/pyu-r-int-thick-7-2453361.pdf?src-supplier=Digi-Key, ComponentLink2URL=https://datasheet.ciiva.com/2453/pyu-r-int-thick-7-2453361.pdf?src-supplier=Digi-Key, ComponentLink3Description=https://datasheet.ciiva.com/2453/pyu-r-int-thick-7-2453362.pdf?src-supplier=Digi-Key, ComponentLink3URL=https://datasheet.ciiva.com/2453/pyu-r-int-thick-7-2453362.pdf?src-supplier=Digi-Key, ComponentLink4Description=https://datasheet.ciiva.com/2453/pyu-r-int-thick-7-2453363.pdf?src-supplier=Digi-Key, ComponentLink4URL=https://datasheet.ciiva.com/2453/pyu-r-int-thick-7-2453363.pdf?src-supplier=Digi-Key, ComponentLink5Description=https://datasheet.ciiva.com/22747/1018594-22747509.pdf?src-supplier=Element14, ComponentLink5URL=https://datasheet.ciiva.com/22747/1018594-22747509.pdf?src-supplier=Element14, ComponentLink6Description=https://datasheet.ciiva.com/15189/getdatasheetpartid-323696-15189334.pdf?src-supplier=Verical, ComponentLink6URL=https://datasheet.ciiva.com/15189/getdatasheetpartid-323696-15189334.pdf?src-supplier=Verical, ComponentLink7Description=https://datasheet.ciiva.com/12667/pyu-rc0402-51-rohs-l-6-r-12667930.pdf?src-supplier=Mouser, ComponentLink7URL=https://datasheet.ciiva.com/12667/pyu-rc0402-51-rohs-l-6-r-12667930.pdf?src-supplier=Mouser, Composition="Thick Film", Depth=0.5mm, Features="Moisture Resistant", Height=0.016inch, Lead Free="Lead Free", Length=0.039inch, Military Standard=Not, Number of Terminations=2, Packaging="Tape and Reel", Power Rating=63mW, Pricing 1="1=0,10000, 10=0,01600, 100=0,00640, 1000=0,00289, 2500=0,00251, 5000=0,00207 (USD)", REACH SVHC="No SVHC", Resistance=100kR, RoHS=Yes, Stock 1=46714668, Supplier 1=Digi-Key, Termination=SMD/SMT, Width=0.02inch, Working Voltage=50V
R648: library part Resistor, "RES SMD 2 OHM 5% 1/16W 0402", Case Code (Imperial)=0402, Case Code (Metric)=1005, Manufacturer=Yageo, Manufacturer Part Number=RC0402JR-072RL, Max Operating Temperature=155°C, Min Operating Temperature=-55°C, Package Quantity=10000, Power Rating=62.5mW, Supplier Part Number 1=311-2.0JRCT-ND, Temperature Coefficient=200ppm/°C, Tolerance=5%, Voltage Rating=50V, Case/Package=0402, Category="Chip SMD Resistors", ComponentLink1Description=https://datasheet.ciiva.com/16863/pyu-rc0402-51-rohs-l-6-16863143.pdf?src-supplier=Avnet+Europe, ComponentLink1URL=https://datasheet.ciiva.com/16863/pyu-rc0402-51-rohs-l-6-16863143.pdf?src-supplier=Avnet+Europe, ComponentLink2Description=https://datasheet.ciiva.com/28415/pyu-rc0402-51-rohs-l-6-28415610.pdf?src-supplier=Avnet+Europe, ComponentLink2URL=https://datasheet.ciiva.com/28415/pyu-rc0402-51-rohs-l-6-28415610.pdf?src-supplier=Avnet+Europe, Composition="Thick Film", Contact Plating=Tin,Matte, Depth=0.5mm, Height=0.35mm, Lead Free="Lead Free", Length=1mm, Military Standard=Not, Number of Terminations=2, Packaging="Tape and Reel", Pricing 1="1=0,10000, 10=0,01900, 100=0,00760, 1000=0,00342, 2500=0,00297, 5000=0,00245 (USD)", Resistance=2R, RoHS=Yes, Stock 1=242315, Supplier 1=Digi-Key, Termination=SMD/SMT, Voltage Rating (DC)=50V, Width=0.5mm, Working Voltage=50V
R650: library part Resistor, "RES SMD 100M OHM 5% 1/16W 0402", Case Code (Imperial)=0402, Case Code (Metric)=1005, Manufacturer="Stackpole Electronics", Manufacturer Part Number=HMC0402JT100M, Max Operating Temperature=125°C, Max Power Dissipation=63mW, Min Operating Temperature=-55°C, Supplier Part Number 1=HMC0402JT100MCT-ND, Temperature Coefficient=400ppm/°C, Tolerance=5%, Case/Package=0402, Category="Chip SMD Resistors", ComponentLink1Description=http://components.arrow.com/part/dataview/58476149S797766N1174?src-supplier=Arrow, ComponentLink1URL=http://components.arrow.com/part/dataview/58476149S797766N1174?src-supplier=Arrow, ComponentLink2Description=http://www.seielect.com/Catalog/SEI-HMC.pdf?src-supplier=Digi-Key, ComponentLink2URL=http://www.seielect.com/Catalog/SEI-HMC.pdf?src-supplier=Digi-Key, ComponentLink3Description=https://www.seielect.com/Catalog/SEI-HMC.pdf?src-supplier=Digi-Key, ComponentLink3URL=https://www.seielect.com/Catalog/SEI-HMC.pdf?src-supplier=Digi-Key, Composition="Thick Film", Depth=0.5mm, Height=0.016inch, Lead Free="Lead Free", Length=0.039inch, Military Standard=Not, Mount="Surface Mount", Number of Terminations=2, Packaging="Tape and Reel", Pricing 1="1=0,38000, 10=0,31800, 100=0,12420, 1000=0,05198, 2500=0,04764, 5000=0,04331 (USD)", Resistance=100MR, RoHS=Yes, Stock 1=245588, Supplier 1=Digi-Key, Width=0.02inch
R652: library part Resistor, "RES SMD 1M OHM 1% 1/16W 0402", Case Code (Imperial)=0402, Case Code (Metric)=1005, Manufacturer=Yageo, Manufacturer Part Number=RC0402FR-071ML, Max Operating Temperature=155°C, Min Operating Temperature=-55°C, Power Rating=63mW, Supplier Part Number 1=311-1.00MLRDKR-ND, Temperature Coefficient=100ppm/°C, Tolerance=1%, Voltage Rating=50V, Case/Package=0402, Category="Chip SMD Resistors", ComponentLink1Description=https://datasheet.ciiva.com/11808/0900766b80c66297-11808125.pdf?src-supplier=RSComponents, ComponentLink1URL=https://datasheet.ciiva.com/11808/0900766b80c66297-11808125.pdf?src-supplier=RSComponents, ComponentLink2Description=https://datasheet.ciiva.com/7849/1018594-7849883.pdf?src-supplier=Element14, ComponentLink2URL=https://datasheet.ciiva.com/7849/1018594-7849883.pdf?src-supplier=Element14, ComponentLink3Description=https://datasheet.ciiva.com/46394/1018594-46394951.pdf?src-supplier=Element14, ComponentLink3URL=https://datasheet.ciiva.com/46394/1018594-46394951.pdf?src-supplier=Element14, ComponentLink4Description=https://datasheet.ciiva.com/16741/pyu-rc0402-51-rohs-l-6-r-16741081.pdf?src-supplier=Future+Electronics, ComponentLink4URL=https://datasheet.ciiva.com/16741/pyu-rc0402-51-rohs-l-6-r-16741081.pdf?src-supplier=Future+Electronics, ComponentLink5Description=https://datasheet.ciiva.com/7849/1018594-7849882.pdf?src-supplier=Element14, ComponentLink5URL=https://datasheet.ciiva.com/7849/1018594-7849882.pdf?src-supplier=Element14, Composition="Thick Film", Depth=0.5mm, Height=0.32mm, Lead Free="Lead Free", Length=1mm, Military Standard=Not, Packaging="Tape and Reel", Pricing 1="1=0,10000, 10=0,01600, 100=0,00640, 1000=0,00289, 2500=0,00251, 5000=0,00207 (USD)", REACH SVHC=Unknown, Resistance=1MR, RoHS=Yes, Stock 1=10014745, Supplier 1=Digi-Key, Termination=SMD/SMT
R653: library part Resistor, "RES SMD 20 OHM 5% 1/5W 0402", Case Code (Imperial)=0402, Case Code (Metric)=1005, Manufacturer=Rohm, Manufacturer Part Number=ESR01MZPJ200, Max Operating Temperature=155°C, Max Power Dissipation=200mW, Min Operating Temperature=-55°C, Package Quantity=1, Supplier Part Number 1=RHM1011CT-ND, Temperature Coefficient=200ppm/°C, Tolerance=5%, Case/Package=0402, Category="Chip SMD Resistors", ComponentLink1Description=https://datasheet.ciiva.com/14928/esr-14928838.pdf?src-supplier=Digi-Key, ComponentLink1URL=https://datasheet.ciiva.com/14928/esr-14928838.pdf?src-supplier=Digi-Key, Composition="Thick Film", Features="Automotive AEC-Q200", Height=0.016inch, Length=0.039inch, Number of Terminations=2, Packaging="Cut Tape", Pricing 1="1=0,23000, 10=0,19400, 100=0,07570, 1000=0,03168, 2500=0,02904, 5000=0,02640 (USD)", Resistance=20R, RoHS=Yes, Stock 1=152113, Supplier 1=Digi-Key, Width=0.02inch
R666: library part Resistor, "RES 0.012 OHM 1% 1/2W 1206", Case/Package=1206, Case Code (Metric)=3216, Manufacturer="Stackpole Electronics", Manufacturer Part Number=CSR1206FK12L0, Max Operating Temperature=155°C, Max Power Dissipation=500mW, Min Operating Temperature=-55°C, Supplier Part Number 1=CSR1206FK12L0CT-ND, Temperature Coefficient=100ppm/°C, Tolerance=1%, Case Code (Imperial)=1206, Category="Chip SMD Resistors", ComponentLink1Description=https://www.seielect.com/catalog/SEI-Packaging.pdf?src-supplier=Digi-Key, ComponentLink1URL=https://www.seielect.com/catalog/SEI-Packaging.pdf?src-supplier=Digi-Key, ComponentLink2Description=http://components.arrow.com/part/dataview/53688935S790003N1174?src-supplier=Arrow, ComponentLink2URL=http://components.arrow.com/part/dataview/53688935S790003N1174?src-supplier=Arrow, ComponentLink3Description=https://www.seielect.com/Catalog/SEI-CSR_CSRN.pdf?src-supplier=Avnet, ComponentLink3URL=https://www.seielect.com/Catalog/SEI-CSR_CSRN.pdf?src-supplier=Avnet, Composition="Thick Film", Contact Plating=Tin,Matte, Depth=1.55mm, Height=0.026inch, Lead Free="Lead Free", Length=0.12inch, Military Standard=Not, Mount="Surface Mount", Number of Terminations=2, Packaging="Tape and Reel", Pricing 1="1=0,65000, 10=0,46200, 25=0,36040, 50=0,30500, 100=0,24020, 250=0,20328, 500=0,16632 (USD)", Resistance=12mR, RoHS=Yes, Stock 1=41108, Supplier 1=Digi-Key, Width=0.061inch